# Altium PCB MiniPC.PcbDoc (part 8 of 24)
Units mm, origin at the board's own origin, x right, y up, seen from the top; angles counter-clockwise.
Board outline 175 x 155 mm, 16 copper layers (1_Top, 2_int1_(gnd), 3_int2_(power), 4_int3_(gnd), 5_int4_(sign), 6_int5_(power), 7_int6_(sign), 8_int7_(power), 9_int8_(gnd), 10_int9_(sign), 11_int10_(gnd), 12_int11_(sign), 13_int12_(gnd), 14_int13_(power), 15_int14_(gnd), 16_Bottom), stack 2.008 mm thick; 1046 components, 837 nets, 6010 pads, 4009 vias.
Unrouted connection lines stored in the file: 564.
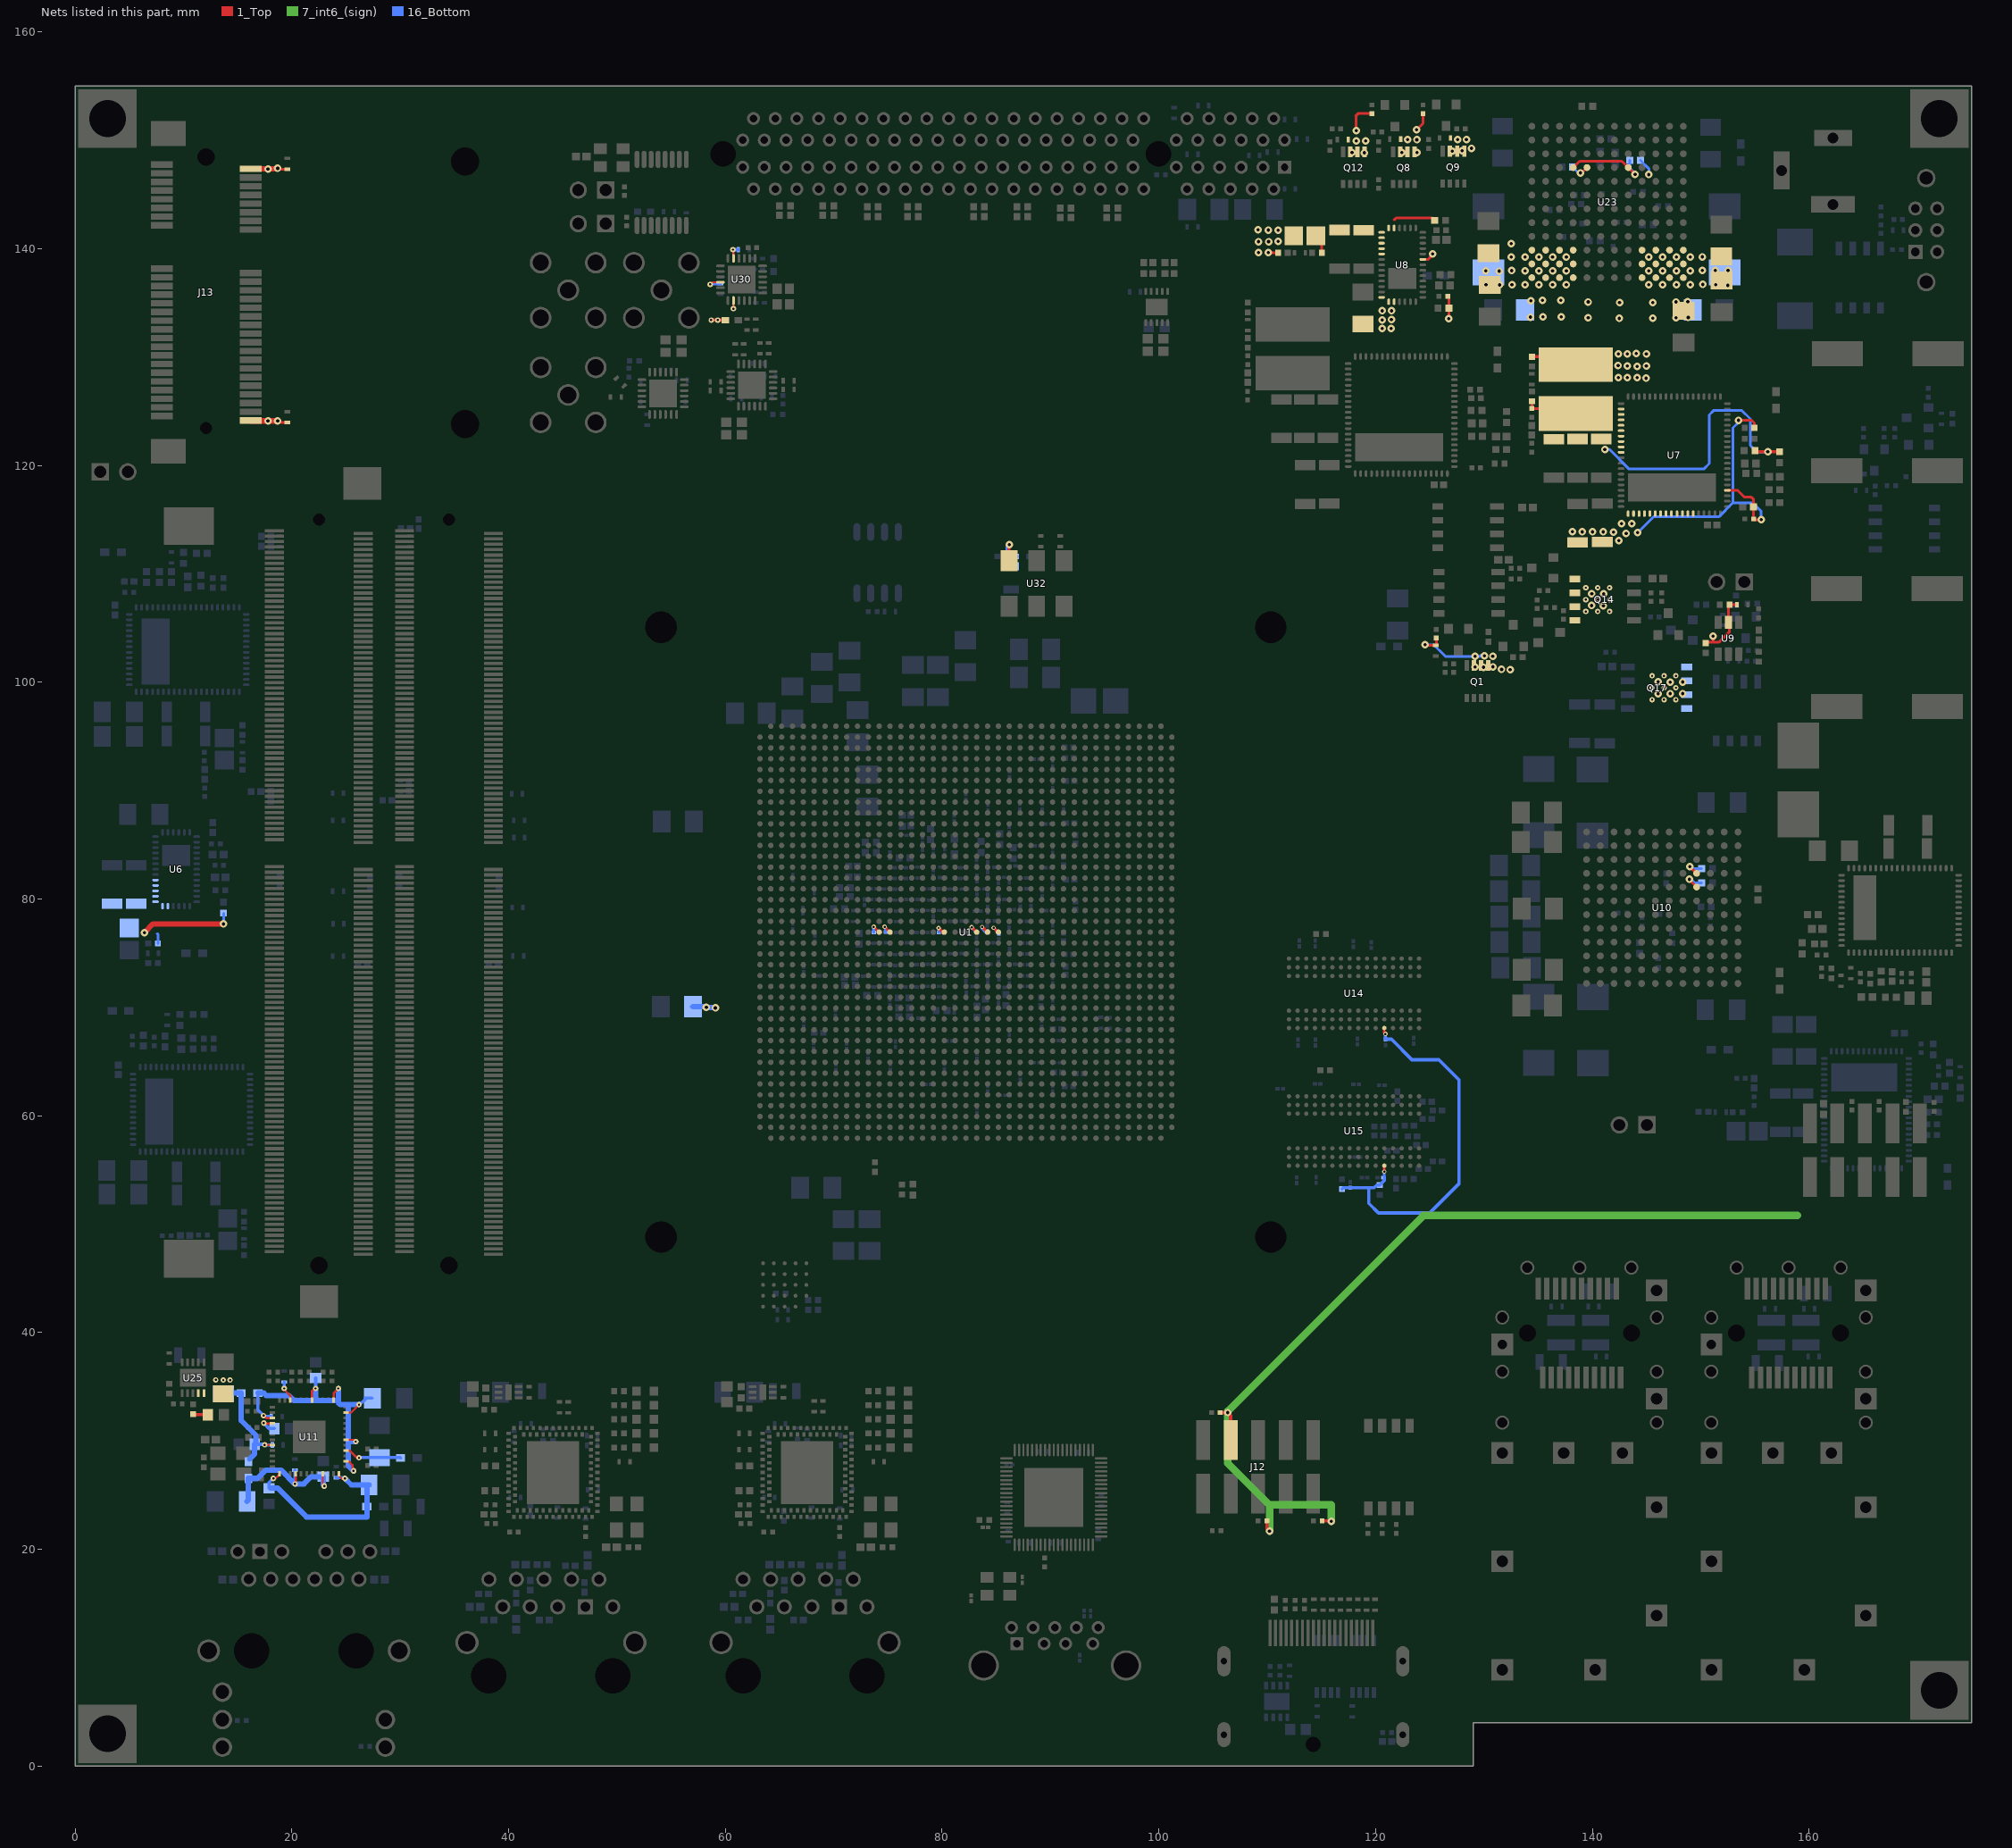
[diagram p20: the nets of this part, all layers, seen from the top]

## Part data (continued)
U3 U7: library part CMP-1689-00005-3, "PowerSoC Highly Integrated Synchronous Buck with Integrated Inductor, 2.5 to 6.6 V Input, -40 to 85 degC, 76-Pin QFN, RoHS, Tape and Reel", Max Operating Temperature="85 degC", Min Operating Temperature="-40 degC", Output Current="12 A", Package Quantity=250, ComponentLink1Description="Manufacturer URL", ComponentLink1URL=https://www.altera.com/, ComponentLink2Description=Datasheet, ComponentLink2URL=https://www.altera.com/content/dam/altera-www/global/en_US/pdfs/literature/ds/en63a0qi_07077.pdf, ComponentLink3Description="Package Specification", ComponentLink3URL=http://wl.altera.com/literature/ds/EN63A0QA_10398.pdf, DatasheetVersion="Rev. H", Height="0.12 inch", Length="0.43 inch", Mount="Surface Mount", Mounting Technology="Surface Mount", PackageDescription="76-Pin Quad-Flat No-Leads Package, Body 11 x 10 mm, Pitch 0.5 mm, Thermal Pad 2.6x8.1mm", PackageVersion="Rev. A, 10/2014", Packaging="Tape and Reel", PartNumber=EN63A0QI, Pins=76, Radiation Hardening=No, RoHSCompliant=True, Width="0.39 inch"
U6 U8: library part CMP-1689-00002-3, "PowerSoC Voltage Mode Synchronous PWM Buck with Integrated Inductor, 2.5 to 6.6 V Input, -40 to 85 degC, 38-Pin QFN, RoHS, Tape and Reel", Max Operating Temperature="85 degC", Min Operating Temperature="-40 degC", Output Current="3 A", Package Quantity=500, ComponentLink1Description="Manufacturer URL", ComponentLink1URL=https://www.altera.com/, ComponentLink2Description=Datasheet, ComponentLink2URL=https://www.altera.com/content/dam/altera-www/global/en_US/pdfs/literature/ds/en6337qi_05800.pdf, DatasheetVersion="Rev. E", Height="0.07 inch", Length="0.28 inch", Mount="Surface Mount", Mounting Technology="Surface Mount", PackageDescription="38-Pin Quad Flat No-Leads Package, Body 7 x 4 mm, Pitch 0.5 mm, Thermal Pad 2.6 x 1.94 mm", Packaging="Tape and Reel", PartNumber=EN6337QI, Pins=38, Radiation Hardening=No, RoHSCompliant=True, Width="0.16 inch"
U9: library part CMP-1708-00001-4, "Window Comparator with Internal Reference for Overvoltage and Undervoltage Detection, 1.8 to 18 V, -40 to 125 degC, 6-Pin SOT (DDC), Green (RoHS & no Sb/Br), Tape and Reel", Case/Package=SOT-6, Max Operating Temperature="125 degC", Max Supply Voltage="18 V", Min Operating Temperature="-40 degC", Min Supply Voltage="1.8 V", Package Quantity=3000, Code_JEDEC=MO-193, ComponentLink1Description="Manufacturer URL", ComponentLink1URL=http://www.ti.com/, ComponentLink2Description=Datasheet, ComponentLink2URL=http://www.ti.com/lit/ds/symlink/tps3700.pdf, ComponentLink3Description="Package Specification", ComponentLink3URL=http://www.ti.com/litv/pdf/mpds124d, DatasheetVersion=SBVS187D, Mount="Surface Mount", Mounting Technology="Surface Mount", PackageDescription="6-Pin Small Outline Transistor, Body 2.9 x 1.6 mm, Pitch 0.95 mm", PackageVersion="4204403-3/E, 06/2005", Packaging="Tape and Reel", PartNumber=TPS3700DDCR, Pins=6, RoHSCompliant=True
U10: library part CMP-1701-00001-1, "Dual 18 A or Single 36 A uModule Regulator with Digital Power System Management, 4.5 to 16 V Input, 0.5 to 1.8 V Output, -40 to 125 degC, 144-Ball BGA, RoHS, Tray", Manufacturer="Linear Technology", ComponentLink1Description="Manufacturer URL", ComponentLink1URL=http://www.linear.com/, ComponentLink2Description=Datasheet, ComponentLink2URL=http://cds.linear.com/docs/en/datasheet/4677f.pdf, ComponentLink3Description="Package Specification", ComponentLink3URL=http://www.linear.com/docs/41077, DatasheetVersion="Rev. F", Mounting Technology="Surface Mount", PackageDescription="144-Ball Ball Grid Array, Body 16 x 16 mm, Pitch 1.27 mm", PackageReference=BGA-144, PackageVersion="Rev. B, 02/2013", PartId=1, PartNumber=LTM4677IY#PBF
U11: library part CMP-1337-00004-2, "Gigabit Ethernet Transceiver with RGMII Support, 1.14 to 1.26 V, 0 to 70 degC, 48-Pin QFN, RoHS", Manufacturer=Micrel, Temperature Range="0 to 70 degC", ComponentLink1Description="Manufacturer URL", ComponentLink1URL=http://www.micrel.com/, ComponentLink2Description=Datasheet, ComponentLink2URL=http://www.micrel.com/_PDF/Ethernet/datasheets/KSZ9031RNX.pdf, ComponentLink3Description="Package Specification", ComponentLink3URL=http://www.micrel.com/_PDF/Ethernet/datasheets/KSZ9031RNX.pdf, DatasheetVersion="Rev. 2.1", Drivers=4, DVDDL="1.14 to 1.26 V", ILED="8 mA Typ.", Mounting Technology="Surface Mount", Output Tri-State Leakage="10 uA Max.", PackageDescription="48-Pin Quad Flat Non-Lead Package, Body 7 x 7 mm, Pitch 0.5 mm", PartNumber=KSZ9031RNXCA, Receivers=4, RoHS=TRUE, VSET@R(ISET)="12.1 KOhm=1.2 V Typ."
U12: library part CMP-1689-00003-3, "PowerSoC Voltage Mode Synchronous PWM Buck with Integrated Inductor, 4 A, 4.5 to 14 V Input, 0.75 to 5 V Output, -40 to 85 degC, 68-Pin QFN, RoHS, Tape and Reel", Max Operating Temperature="85 degC", Min Operating Temperature="-40 degC", Package Quantity=1, ComponentLink1Description="Manufacturer URL", ComponentLink1URL=https://www.altera.com/, ComponentLink2Description=Datasheet, ComponentLink2URL=https://www.altera.com/content/dam/altera-www/global/en_US/pdfs/literature/ds/en2342qi_09520.pdf, DatasheetVersion="Rev. F", Mount="Surface Mount", Mounting Technology="Surface Mount", PackageDescription="68-Pin Quad Flat No-lead Package, Body 11 x 8 mm, Pitch 0.5 mm, Thermal Pad 2.1 x 6 mm", Packaging="Cut Tape", PartNumber=EN2342QI, Pins=68, RoHSCompliant=True
U13: library part CMP-1701-00004-2, "Nanopower Precision Shunt Voltage Reference, 1.25 V, 0.05%, 10 ppm/degC, 0 to 70 degC, 8-Pin S8, Tube", Current - Cathode=600µA, Current - Output=20mA, Current - Supply=-, Operating Temperature="0°C ~ 70°C (TA)", Package / Case="8-SOIC (0.154&quot;, 3.90mm Width)", Standard Package=100, Temperature Coefficient=10ppm/°C, Tolerance=±0.05%, Voltage - Output (Min/Fixed)=1.25V, Category="Integrated Circuits (ICs)", ComponentLink1Description="Manufacturer URL", ComponentLink1URL=http://www.linear.com/, ComponentLink2Description=Datasheet, ComponentLink2URL=http://cds.linear.com/docs/en/datasheet/1389fa.pdf, DatasheetVersion="Rev. A", Family="PMIC - Voltage Reference", Mounting Technology="Surface Mount", Mounting Type="Surface Mount", Noise - 0.1Hz to 10Hz=25µVp-p, Noise - 10Hz to 10kHz=-, Output Type=Fixed, PackageDescription="8-Pin Small Outline Integrated Package, Body 5 x 4 mm, Pitch 1.27 mm", Packaging=Tube, PartNumber=LT1389ACS8-1.25, Product Training Modules="Voltage Reference Basics", Reference Type=Shunt, Series=-, Voltage - Input=-, Voltage - Output (Max)=-
U14 U15: library part CMP-1718-00002-1, "8 Gb DDR4 SDRAM, 512 Meg x 16, 1.2 V, 0 to 95 degC, 96-Ball FBGA (LY), RoHS", ComponentLink1Description="Manufacturer URL", ComponentLink1URL=http://www.micron.com/, ComponentLink2Description=Datasheet, ComponentLink2URL=https://www.micron.com/~/media/documents/products/data-sheet/dram/ddr4/8gb_ddr4_sdram.pdf, DatasheetVersion="Rev. E, 05/2016", Mounting Technology="Surface Mount", PackageDescription="96-Ball Fine Pitch Ball Grid Array, Body 7.5 x 13.5 mm, Pitch 0.8 mm", PartId=1, PartNumber=MT40A512M16LY-107E
U16: library part CMP-0247-00012-3, "Adjustable Current-Limit Switch, 1.7 to 5.5 V, -40 to 125 degC, 8-Pin TDFN (T833+2), RoHS", Manufacturer=Maxim, Operating Temperature="-40 to 125 degC", ComponentLink1Description="Manufacturer URL", ComponentLink1URL=http://www.maximintegrated.com/, ComponentLink2Description=Datasheet, ComponentLink2URL=http://datasheets.maximintegrated.com/en/ds/MAX14523A-MAX14523C.pdf, ComponentLink3Description="Package Specification", ComponentLink3URL=http://pdfserv.maximintegrated.com/package_dwgs/21-0137.PDF, DatasheetVersion="Rev. 1", ILIM="0.25 to 1.5 A", IQ="170 uA Typ.", Mounting Technology="Surface Mount", PackageDescription="8-Pin SON, Body 3 x 3 mm, Pitch 0.65 mm", PackageVersion=Mar-14, PartNumber=MAX14523AATA+, RoHS=TRUE, RON="70 mOhm Typ.", VIH="1.6 V Min.", VIL="0.4 V Max.", VIN="1.7 to 5.5 V"
U17 U20: library part CMP-1702-00002-3, "Integrated 10/100/1000 Ultra Gigabit Ethernet Transceiver, Commercial Grade, 96-Pin QFN, RoHS", ComponentLink1Description="Manufacturer URL", ComponentLink1URL=http://www.marvell.com/, ComponentLink2Description=Datasheet, ComponentLink2URL=http://www.marvell.com//transceivers/assets/Marvell-Alaska-Ultra-88E1111-GbE.pdf, DatasheetVersion="Rev. A", Mounting Technology="Surface Mount", PackageDescription="96-Pin Quad Flat No-lead Package, Body 9 x 9 mm, Pitch 0.3 mm", PartNumber=88E1111-B2-NDC2C000
U18 U21 U24: library part CMP-1695-00002-3, "Crystal Oscillator (SPXO), 2.5 V, 25 MHz, -20 to 70 degC, 4-Pin SMD, RoHS, Tape and Reel", Max Operating Temperature="70 degC", Min Operating Temperature="-20 degC", ComponentLink1Description="Manufacturer URL", ComponentLink1URL=https://www.eea.epson.com/, ComponentLink2Description=Datasheet, ComponentLink2URL=http://www5.epsondevice.com/en/products/spxo_standard/sg310sdf.html#, DatasheetVersion="Rev. Feb-15", Height="1.05 mm", Length="3.2 mm", Mounting Technology="Surface Mount", PackageDescription="4-Pin Surface Mount Device, Body 3.2 x 2.5 mm", Packaging="Tape and Reel", PartNumber="SG-310SDF 25.0000M-B3", RoHSCompliant=True, Width="2.5 mm"
U19 U22: library part CMP-0476-00124-4, "500 mA Micropower VLDO Linear Regulator, 0.9 to 5.5 V Vin, Adjustable Vout, 6-pin SON (DC6-6), -40 to 125 degC, Pb-Free", Dropout Voltage(V)=0.085, Manufacturer="Linear Technology", Output Voltage=Adj, Shutdown Current(uA)=1, Code_JEDEC=MO-229, ComponentLink1Description="Manufacturer URL", ComponentLink1URL=http://www.linear.com/, ComponentLink2Description=Datasheet, ComponentLink2URL=http://cds.linear.com/docs/en/datasheet/30251234ff.pdf, ComponentLink3Description="Package Specification", ComponentLink3URL=http://cds.linear.com/docs/en/packaging/DFN_6_05-08-1703.pdf, DatasheetVersion="Rev. F", Discrete Pass Element=no, Iout(mA)=500, Isupply(mA)=0.05, Mounting Technology="Surface Mount", Noise(uV)=80, Number of Outputs=1, PackageDescription="6-Pin Plastic DFN, Body 2 x 2 mm, Pitch 0.5 mm", PackageReference=DC6-6, PackageVersion="Rev. B, 06/2010", PartNumber=LTC3025EDC-1#PBF, RoHS=TRUE, Vin Max(V)=5.5, Vin Min(V)=0.9, Vout Max(V)=3.6, Vout Min(V)=0.4
U23: library part CMP-1701-00002-3, "Dual 13 A or Single 26 A uModule Regulator with Digital Power System Management, 4.5 to 26.5 V Input, 0.5 to 5.4 V Output, -40 to 125 degC, 144-Ball BGA, RoHS, Tray", Case/Package=BGA, Max Operating Temperature="125 degC", Min Operating Temperature="-40 degC", Output Current="26 A", Package Quantity=90, ComponentLink1Description="Manufacturer URL", ComponentLink1URL=http://www.linear.com/, ComponentLink2Description=Datasheet, ComponentLink2URL=http://cds.linear.com/docs/en/datasheet/4676fd.pdf, ComponentLink3Description="Package Specification", ComponentLink3URL=http://www.linear.com/docs/41077, DatasheetVersion="Rev. D", Height="0.2 inch", Length="0.63 inch", Mount="Surface Mount", Mounting Technology="Surface Mount", PackageDescription="144-Ball Ball Grid Array, Body 16 x 16 mm, Pitch 1.27 mm", PackageVersion="Rev. B, 02/2013", Packaging=Rail/Tube, PartId=1, PartNumber=LTM4676IY#PBF, Pins=144, REACH SVHC="No SVHC", RoHSCompliant=True, Width="0.63 inch"
U25: library part CMP-0476-00185-2, "1.5 A Low Input Voltage VLDO Linear Regulator, Boost Converter Disabled, Require 5 V External Supply, 1.14 to 5.5 V Vin, Adjustable Vout, 10-pin SON (DD-10), -40 to 125 degC, Pb-Free", Dropout Voltage(V)=0.1, Manufacturer="Linear Technology", Output Voltage=Adj, Shutdown Current(uA)=0.6, Code_JEDEC=MO-229, ComponentLink1Description="Manufacturer URL", ComponentLink1URL=http://www.linear.com/, ComponentLink2Description=Datasheet, ComponentLink2URL=http://cds.linear.com/docs/en/datasheet/30261f.pdf, ComponentLink3Description="Package Specification", ComponentLink3URL=http://cds.linear.com/docs/en/packaging/DFN_10_05-08-1699.pdf, Discrete Pass Element=no, Iout(mA)=1500, Isupply(mA)=0.095, Mounting Technology="Surface Mount", Noise(uV)=110, Number of Outputs=1, PackageDescription="10-Pin Plastic DFN, Body 3 x 3 mm, Pitch 0.5 mm", PackageReference=DD-10, PackageVersion="Rev. C, 06/2010", PartNumber=LTC3026EDD-1#PBF, PSRR(dB)=42, RoHS=TRUE, Vin Max(V)=5.5, Vin Min(V)=1.14, Vout Max(V)=2.6, Vout Min(V)=0.4
U26: library part CMP-1689-00001-1, "EPCQ-L Serial Configuration Device, 1.8 V, -40 to 85 degC, 24-Pin FBGA, RoHS, Tray", Manufacturer=Altera, ComponentLink1Description="Manufacturer URL", ComponentLink1URL=https://www.altera.com/, ComponentLink2Description=Datasheet, ComponentLink2URL=https://www.altera.com/content/dam/altera-www/global/en_US/pdfs/literature/hb/cfg/cfg_cf52013.pdf, ComponentLink3Description="Package Specification", ComponentLink3URL=https://www.altera.com/content/dam/altera-www/global/en_US/pdfs/literature/packaging/04r00469-01.pdf, DatasheetVersion="Rev. 2016-05-30", Mounting Technology="Surface Mount", PackageDescription="24-Pin FineLine Ball-Grid Array, Body 6 x 8 mm, Pitch 1 mm", PackageReference=FBGA24_A-130, PackageVersion="Rev. 2.0, 01/2015", PartId=1, PartNumber=EPCQL1024F24IN
U27 U28: library part CMP-1706-00002-1, "I2C-Programmable Any-Frequency, Any-Output Quad Clock Generator, 1.8 / 2.5 / 3.3 V, 0.16 to 350 MHz Output, -40 to 85 degC, 24-Pin QFN, RoHS", Manufacturer="Silicon Labs", Code_IPC=J-STD-020, ComponentLink1Description="Manufacturer URL", ComponentLink1URL=http://www.silabs.com/, ComponentLink2Description=Datasheet, ComponentLink2URL=https://www.silabs.com/Support%20Documents/TechnicalDocs/Si5338.pdf, DatasheetVersion="Rev. 1.6", Mounting Technology="Surface Mount", PackageDescription="24-Pin Quad Flat No-lead Package, Body 4 x 4 mm, Pitch 0.5 mm", PackageReference=QFN-24, PartId=1, PartNumber=Si5338B-B03799-GM
U29: library part CMP-1706-00007-1, "PCI-Express Gen 1 Dual Output Clock Generator, 3.13 to 3.46 V, -40 to 85 degC, 10-Pin TDFN, RoHS, Tube", Manufacturer="Silicon Labs", Code_IPC=J-STD-020, Code_JEDEC=MO-229, ComponentLink1Description="Manufacturer URL", ComponentLink1URL=http://www.silabs.com/, ComponentLink2Description=Datasheet, ComponentLink2URL=http://www.silabs.com/Support%20Documents/TechnicalDocs/Si52112-A1-A2.pdf, DatasheetVersion="Rev. 1.2", Mounting Technology="Surface Mount", PackageDescription="10-Pin Small Outline Non-Lead, Body 3.00 x 3.00 mm, Pitch 0.50 mm", PackageReference=TDFN-10, PartNumber=Si52112-A1-GM2
U30: library part CMP-1706-00005-1, "I2C-Programmable Any-Frequency, Any-Output Quad Clock Generator, 1.8 / 2.5 / 3.3 V, 0.16 to 200 MHz Output, -40 to 85 degC, 24-Pin QFN, RoHS", Manufacturer="Silicon Labs", Code_IPC=J-STD-020, ComponentLink1Description="Manufacturer URL", ComponentLink1URL=http://www.silabs.com/, ComponentLink2Description=Datasheet, ComponentLink2URL=https://www.silabs.com/Support%20Documents/TechnicalDocs/Si5338.pdf, DatasheetVersion="Rev. 1.6", Mounting Technology="Surface Mount", PackageDescription="24-Pin Quad Flat No-lead Package, Body 4 x 4 mm, Pitch 0.5 mm", PackageReference=QFN-24, PartId=1, PartNumber=Si5338C-B03798-GM
U31: library part CMP-1699-00001-1, "Single-Ended Multiplexer, 2.375 to 3.465 V, -40 to 85 degC, 16-Pin TSSOP, RoHS, Tube", Manufacturer=IDT, ComponentLink1Description="Manufacturer URL", ComponentLink1URL=http://www.idt.com/, ComponentLink2Description=Datasheet, ComponentLink2URL=https://datasheet.ciiva.com/6676/idt-83054i-dst-20091106-6676576.pdf, DatasheetVersion="Rev. C", Mounting Technology="Surface Mount", PackageDescription="16-Pin Thin Shrink Small Outline Package, Body 5 x 4.4 mm, Pitch 0.65 mm", PackageReference=TSSOP-16, PartNumber=ICS83054AGILF
U32: library part CMP-1706-00001-1, "Dual Frequency Voltage-Controlled Crystal Oscillator (VCXO), LVDS, 2.5 V, 100 KHz to 250 MHz, -40 to 85 degC, 6-Pin DFN, RoHS, Tray", Manufacturer="Silicon Labs", ComponentLink1Description="Manufacturer URL", ComponentLink1URL=http://www.silabs.com/, ComponentLink2Description=Datasheet, ComponentLink2URL=http://www.silabs.com/Support%20Documents/TechnicalDocs/Si516.pdf, DatasheetVersion="Rev. 1.0", Mounting Technology="Surface Mount", PackageDescription="6-Pin Small Outline No-lead, Body 5 x 7 mm, Pitch 2.54 mm", PackageReference=DFN-6, PartNumber=516FHA000132AAG
U33: library part CMP-1723-00001-1, "32 Bit USB 3.0 to FIFO Bridge, 5 Gbps, 3 to 3.6 V, -40 to 85 degC, 76-Pin QFN, Pb-Free", ComponentLink1Description="Manufacturer URL", ComponentLink1URL=http://www.ftdichip.com/, ComponentLink2Description=Datasheet, ComponentLink2URL=http://www.ftdichip.com/Support/Documents/DataSheets/ICs/DS_FT600Q-FT601Q%20IC%20Datasheet.pdf, DatasheetVersion="Rev. 1.02, 02/2016", Mounting Technology="Surface Mount", PackageDescription="76-Pin Quad Flat No-lead Package, Body 9 x 9 mm, Pitch 0.4 mm, Thermal Pad 5.45 x 5.45 mm", PackageReference=QFN-76, PartId=1, RoHSCompliant=false
X1 Y5: library part CMP-1688-00001-1, "CMOS Compatible SMD Crystal Oscillator, 33 MHz, 2.5 V, -20 to 70 degC, 4-Pin SMD, RoHS, Tape and Reel", Manufacturer=Abracon, ComponentLink1Description="Manufacturer URL", ComponentLink1URL=http://www.abracon.com/, ComponentLink2Description=Datasheet, ComponentLink2URL=http://www.abracon.com/Oscillators/ASE2series.pdf, DatasheetVersion="Rev. Aug-14", Mounting Technology="Surface Mount", PackageDescription="4-Pin Surface Mount Device, Body 3.2 x 2.5 mm, Pitch 2.1 mm", PackageReference=ASE2, PartNumber=ASE2-33.000MHZ-ET
Y1 Y2 Y3 Y4: library part CMP-1695-00001-3, "Range Crystal Unit, 25 MHz, -40 to 85 degC, 4-Pin SMD, RoHS, Tape and Reel", ComponentLink1Description="Manufacturer URL", ComponentLink1URL=https://www.eea.epson.com/, ComponentLink2Description=Datasheet, ComponentLink2URL=https://support.epson.biz/td/api/doc_check.php?dl=brief_FA-128_en.pdf, DatasheetVersion="Rev. Feb-15", Mounting Technology="Surface Mount", PackageDescription="4-Pin Surface Mount Device, Body 1.6 x 2 mm, Pitch 1.45 mm", PartNumber="FA-128 25.0000MB-C"

## Free pads (board coordinates)
  round 0 hole 2.9: 0(54.069,48.814) 1(110.319,48.814) 2(54.069,105.064) 3(110.319,105.064)
  round 0 hole 2.6: 4(36,148.025) 5(36,123.825)

## Via types
v1: diameter 0.4, hole 0.2, 1_Top to 16_Bottom, tented both sides, 1658 vias
v2: diameter 0.5, hole 0.2, 1_Top to 16_Bottom, tented both sides, 1014 vias
v3: diameter 0.7, hole 0.3, 1_Top to 16_Bottom, tented both sides, 915 vias
v4: diameter 0.6, hole 0.2, 1_Top to 16_Bottom, tented both sides, 278 vias
v5: diameter 0.4, hole 0.2, 1_Top to 16_Bottom, 93 vias
v6: diameter 0.4/0/0/0/0/0/0/0/0/0/0/0/0/0/0/0.4 (per signal layer), hole 0.2, 1_Top to 16_Bottom, tented both sides, 18 vias
v7: diameter 0.4/0/0/0/0/0/0/0/0/0/0/0.4/0.4/0.4/0.4/0.4 (per signal layer), hole 0.2, 1_Top to 16_Bottom, tented both sides, 16 vias
v8: diameter 0.5, hole 0.254, 1_Top to 16_Bottom, tented both sides, 15 vias
v9: diameter 0.5, hole 0.2, 1_Top to 16_Bottom, 2 vias

## Nets (pads, with @x,y where several pads share a name; then routed paths per layer and width w, separated by ;. In a path a pad name is that pad's centre, name@x,y a point inside that pad or via, vN(x,y) a via of type N, cw(c..) or ccw(c..) an arc to the next point about the centre after c; other vN are vias at no path point)
0.9VO_SENSE+: R142.1 U10.D9 | length 2.1
  1_Top w0.254: v3(148.99,82.995) U10.D9@149.615,82.37
  16_Bottom w0.254: v3(148.99,82.995) 149.19,82.795 R142.1@150.09,82.795
0.9VO_SENSE-: R143.1 U10.E9 | length 2.3
  1_Top w0.25: v3(148.96,81.815) 148.96,81.755 149.455,81.26 U10.E9@149.455,81.1
  16_Bottom w0.25: v3@148.96,81.715 v3(148.96,81.815)
  16_Bottom w0.254: v3@148.99,81.895 149.39,81.495 R143.1@150.09,81.495
0V95: C46.2 C47.2 C161.2 C162.2 C163.2 C164.2 C165.2 C166.2 C167.2 R83.2 R84.2 R85.1 U1.Y12 U1.Y13 U1.Y18 U1.Y21 U1.Y22 U1.Y23 U6.5 U6.6 U6.7 U6.8 U6.9 U6.10 U6.11 | length 19.5
  1_Top w0.25: v1(73.694,77.439) U1.Y12@74.194,76.939 ; v1(74.694,77.439) U1.Y13@75.194,76.939
  1_Top w0.3: v1(79.675,77.325) 80.061,76.939 U1.Y18@80.194,76.939 ; v1(82.725,77.4) 82.733,77.4 U1.Y21@83.194,76.939 ; v1(83.685,77.425) 83.708,77.425 U1.Y22@84.194,76.939 ; v1(84.75,77.35) 85.161,76.939 U1.Y23@85.194,76.939
  1_Top w0.5: v3(6.4,76.9) 7.2,77.7 v3(13.7,77.7)
  16_Bottom w0.25: 7.6,76.8 7.65,76.75 R84.2@7.65,75.9 ; v3(13.7,77.7) R85.1@13.7,78.7
  16_Bottom w0.3: C161.2@56.875,70.075 C161.2@57,70.075 ; v3@58.975,70 59,70.025 v3(59.075,69.95) ; C164.2@73.685,76.925 73.685,77.431 v1(73.694,77.439) ; v1(74.694,77.439) 74.785,77.348 C167.2@74.785,76.95 ; v1(79.675,77.325) 79.69,77.31 C163.2@79.69,76.925 ; v1(82.725,77.4) 82.725,77.385 C166.2@83.175,76.935 ; v1(83.685,77.425) 83.685,77.301 83.996,76.99 C162.2@84.175,76.99 ; v1(84.75,77.35) 85.225,76.875 C165.2@85.225,76.835
  16_Bottom w0.5: C161.2@57,70.075 58.175,70.075 v3(58.25,70) v3@58.975,70
1.2V_AVDDL: C371.2 C372.2 C373.2 L11.2 U11.4 U11.9 | length 14.7
  1_Top w0.2: v2(20.3,26.05) 20.362,25.988 U11.4@20.362,26.975 ; U11.9@22.862,26.975 22.862,25.988 v2(23,25.85)
  16_Bottom w0.3: v2@20.297,26.025 C373.2@20.297,27.325
  16_Bottom w0.5: C371.2@15.872,24.425 15.997,24.55 L11.2@15.997,26.55 16.822,26.55 17.597,27.325 18.997,27.325 20.297,26.025 20.321,26.05 21.121,26.05 21.772,26.7 C372.2@22.897,26.7 22.897,25.953 v2(23,25.85)
1.2V_AVDLL_PLL: C367.2 C368.2 C369.2 C374.2 C375.2 L11.1 L13.1 R314.2 U11.44 U25.9 U25.10 | length 12.1
  1_Top w0.2: v2(13.677,35.625) v2@13.687,35.635 ; v2(17.5,29.65) 17.5,29.55 17.576,29.625 U11.44@18.212,29.625
  1_Top w0.3: R314.2@10.897,32.425 C375.2@12.272,32.425
  16_Bottom w0.3: C367.2@13.597,34.425 C367.2@13.722,34.3 ; C368.2@16.562,29.7 16.697,29.7 17.422,29.7 17.472,29.65 v2(17.5,29.65) C369.2@18.2,29.65
  16_Bottom w0.5: C367.2@14.197,34.425 L13.1@15.322,34.425 15.322,31.9 16.697,30.525 C368.2@16.697,29.7 ; L11.1@16.097,28.325 16.562,28.79 C368.2@16.562,29.7
  other v2: 14.297,35.625 12.979,35.636
1.2V_DVDDL: C381.2 C382.2 C383.2 L13.2 U11.14 U11.18 U11.23 U11.26 U11.30 U11.39 | length 31.9
  1_Top w0.17: U11.18@25.012,30.125 25.724,30.125 v2(25.9,29.95)
  1_Top w0.2: v2(17.4,32.35) 17.423,32.35 17.647,32.125 U11.39@18.212,32.125 ; U11.30@21.862,33.775 21.862,34.611 22.1,34.85 v2(22.2,34.85) ; U11.26@23.862,33.775 23.862,34.404 24.3,34.843 v2(24.3,34.85) ; U11.14@25.012,28.125 25.245,28.125 25.6,27.77 25.6,27.35 v2(25.7,27.25) ; U11.23@25.012,32.625 25.476,32.625 v2(26.2,33.35)
  16_Bottom w0.3: L13.2@16.872,34.425 16.872,32.878 v2(17.4,32.35) 17.5,32.25 C383.2@18.1,32.25 ; v2@22.2,34.829 v2(22.2,34.85) C382.2@22.2,35.825 ; v2@26.197,33.425 26.271,33.5 26.428,33.5 26.75,33.822 26.75,33.95 C381.2@27.425,33.95
  16_Bottom w0.5: L13.2@16.872,34.425 17.405,34.425 17.631,34.2 19.722,34.2 20.197,33.725 22.197,33.725 ; v2@22.2,34.829 22.197,34.825 22.197,33.725 ; v2(24.3,34.85) 24.297,34.846 24.297,33.625 ; v2(25.7,27.25) 25.197,27.753 25.197,29.947 ; v2(25.9,29.95) 25.897,29.947 25.197,29.947 ; v2(26.2,33.35) 25.197,33.35 ; 22.197,33.725 24.197,33.725 24.297,33.625 ; 24.297,33.625 24.297,33.525 24.472,33.35 25.197,33.35 ; 25.197,29.947 25.197,33.35
1.8V_DVDDH: C385.2 C386.2 C387.1 L14.2 U11.16 U11.34 U11.40 | length 9.2
  1_Top w0.2: v2(17.408,31.658) 17.496,31.658 17.528,31.625 U11.40@18.212,31.625 ; v2(19.3,34.85) 19.3,34.75 19.862,34.188 U11.34@19.862,33.775 ; U11.16@25.012,29.125 25.324,29.125 26,28.45 v2(26.2,28.45)
  16_Bottom w0.3: v2(17.408,31.658) 17.916,31.15 C386.2@18.375,31.15 ; v2@19.297,34.825 19.3,34.829 v2(19.3,34.85) C387.1@19.3,35.45 ; v2(26.2,28.45) 26.225,28.475 C385.2@28.1,28.475 30,28.475 L14.2@30.025,28.45
1V8: Q17.5 Q17.6 Q17.7 Q17.8 R96.1 R98.2 | length 4.3
  1_Top w0.3: R98.2@134.43,130.02 137.73,130.02 R96.1@138.47,129.28
  other v2: 145.505,98.385 146.605,98.385 147.705,98.385 145.505,99.485 146.605,99.485 147.705,99.485 145.505,100.585 146.605,100.585 147.705,100.585
  other v3: 146.06,98.92 147.17,98.95 148.32,98.95 147.16,100.01 148.33,100.02 146.07,100.03 144.96,128.04 142.39,128.11 143.23,128.1 144.13,128.1 144.13,129.13 143.22,129.16 142.37,129.2 144.97,129.18 142.38,130.28 143.22,130.29 144.97,130.28 144.05,130.31
1V8_OUT: C54.2 C55.2 C56.2 R92.1 R95.1 R96.2 R97.2 R99.2 U7.20 U7.21 U7.22 U7.23 U7.24 U7.25 U7.26 U7.27 U7.28 | length 30.9
  1_Top w0.25: R99.2@134.42,125.92 134.42,125.26 R92.1@134.41,125.25 138,125.25 R96.2@138.47,124.78 ; R97.2@155,121.35 155.091,121.26 v3(156.18,121.26) R95.1@157.27,121.26
  16_Bottom w0.25: v3(141.14,121.48) 141.56,121.48 143.38,119.66 150.27,119.66 150.77,120.16 150.77,124.66 151.17,125.06 153.79,125.06 154.57,124.28 154.57,121.84 155.15,121.26 v3(156.18,121.26)
1V8_PLL: C537.2 C538.2 L20.1 U30.11 U30.16 U30.20 | length 5.4
  1_Top w0.17: v2(58.6,136.699) 58.801,136.9 U30.16@59.545,136.9 ; v2(60.7,139.9) 60.745,139.855 U30.11@60.745,139.1 ; v2(60.745,134.455) U30.20@60.745,135.2
  1_Top w0.3: v2(58.7,133.4) v2(59.3,133.4) L20.1@60,133.4
  16_Bottom w0.3: v2(58.6,136.699) 58.676,136.775 C538.2@59.545,136.775 ; v2@60.7,134.5 v2(60.745,134.455) ; v2(60.7,139.9) C537.2@61.175,139.9
2.5V_SI516: C548.2 C549.2 L22.1 U32.6 | length 4.8
  1_Top w0.3: U32.6@86.17,111.2 86.17,112.67 v3(86.2,112.7)
  16_Bottom w0.3: v3(86.2,112.7) 86,112.7 85.989,112.689 L22.1@85.989,111.6 ; C549.2@86.36,110.7 85.989,111.07 L22.1@85.989,111.6 ; C548.2@86.91,111.6 L22.1@85.989,111.6
2V5: C1.2 Q1.1 Q1.2 Q1.3 R1.2 R104.2 R105.2 | length 8.4
  1_Top w0.25: v3(110.09,139.63) 110.11,139.61 R104.2@110.99,139.61 ; v3(124.56,103.45) 124.6,103.41 C1.2@125.55,103.41 125.59,103.45 R1.2@125.59,104.07
  16_Bottom w0.25: v3(124.56,103.45) 125.36,103.45 126.321,102.489 126.332,102.5 126.442,102.39 v3(129.17,102.39) 129.6,102.39 129.71,102.5 v3@129.81,102.4
  other v3: 132.41,101.15 131.62,101.18 129.96,101.38 129.17,101.4 130.81,101.42 130.8,102.4 130.03,102.42 109.2,139.62 109.2,140.64 110.12,140.64 111.01,140.67 111.01,141.68 109.16,141.72 110.09,141.71
2V5OUT: C62.2 C63.2 R105.1 R106.2 R107.1 U8.5 U8.6 U8.7 U8.8 U8.9 U8.10 U8.11 | length 5.7
  1_Top w0.25: R105.1@114.485,141.18 115.03,140.635 R106.2@115.03,139.61 ; 121.71,142.65 121.89,142.83 125.22,142.83 R107.1@125.45,142.6
3.3V_AVDDH: C378.2 C379.2 C380.2 L12.2 U11.1 U11.12 | length 19.2
  1_Top w0.2: v2(18.3,26.55) 18.5,26.55 18.862,26.911 U11.1@18.862,26.975 ; U11.12@24.362,26.975 24.362,26.788 24.6,26.55 v2(24.9,26.55)
  16_Bottom w0.3: C379.2@18.056,25.65 C379.2@17.897,25.65 17.897,26.177 18.269,26.55 v2(18.3,26.55) ; C380.2@24.097,26.625 24.824,26.625 v2(24.9,26.55)
  16_Bottom w0.5: C379.2@18.056,25.65 18.709,25.65 21.36,23 26.925,23 L12.2@26.925,23.95 26.925,25.75 C378.2@26.725,25.95 ; v2(24.9,26.55) 25.5,25.95 C378.2@26.725,25.95 ; C378.2@27.125,25.95 C378.2@26.725,25.95
3V3: C4.2 C5.2 C6.2 C52.2 C53.2 C61.2 C69.2 C95.1 C96.2 C97.2 C98.2 C101.1 C102.2 C103.2 C104.2 C105.2 C481.2 C482.1 J12.4 J13.2 J13.52 Q8.1 Q8.2 Q8.3 Q9.1 Q9.2 Q9.3 Q12.1 Q12.2 Q12.3 Q14.5 Q14.6 Q14.7 Q14.8 R12.2 R13.2 R100.1 R101.1 R102.2 R109.1 R111.1 R122.1 R123.1 R156.2 R329.2 R330.1 R331.1 U7.39 U7.40 U7.41 U7.42 U7.43 U7.44 U7.45 U7.46 U7.47 U7.48 U7.49 U7.50 U7.51 U7.60 U8.19 U8.20 U8.21 U8.33 U9.5 U23.A1 U23.A2 U23.A3 U23.B1 U23.B2 U23.B3 U23.C1 U23.C2 U23.C3 U23.D1 U23.D2 U23.D3 U23.J1 U23.J2 U23.J3 U23.K1 U23.K2 U23.K3 U23.L1 U23.L2 U23.L3 U23.M1 U23.M2 U23.M3 | length 137.2
  1_Top w0.25: v3(18.7,124.1) 18.84,123.96 C481.2@19.583,123.96 ; v3(18.7,147.4) 18.75,147.35 18.772,147.328 C482.1@19.583,147.328 ; v3(118.2,150.875) 118.2,152.22 118.17,152.25 118.37,152.45 R12.2@119.67,152.45 ; v3(123.77,150.95) 124.37,151.55 R13.2@124.37,152.45 ; U8.33@124.35,139 124.833,139 v3@125.05,139.217 ; v3(125.25,139.5) 125.25,139.425 v3@125.05,139.225 ; R111.1@126.55,135.7 126.75,135.5 R109.1@126.75,134.5 v3(126.75,133.54) ; R122.1@150.445,103.6 150.545,103.7 151.695,103.7 152.645,104.65 U9.5@152.645,105.55 ; U7.60@152.445,117.7 153.396,117.7 154.036,117.06 154.67,117.06 154.87,116.86 R100.1@154.87,116.16 R102.2@154.87,115.06 154.795,114.985 v3(155.57,114.985) ; U9.5@152.545,105.525 152.545,107.15 R123.1@152.645,107.15 C69.2@153.345,107.15 ; v3(153.47,124.16) 154.7,124.16 154.945,123.915 R101.1@154.945,123.46 ; v3@125.05,139.217 125.05,139.2 125.075,139.225 v3@125.05,139.225 ; v3@125.05,139.217 v3@125.05,139.225
  1_Top w0.3: R329.2@105.66,32.625 v3(106.36,32.625) 106.62,32.365 J12.4@106.62,30.1 ; R331.1@109.96,22.625 109.96,21.94 v3(110.2,21.7) ; R330.1@115.06,22.625 115.875,22.625 v3(115.9,22.6) ; 151.12,103.75 v3(151.12,104.25)
  1_Top w0.5: J13.52@16.2,124.15 16.25,124.1 v3(17.8,124.1) v3(18.7,124.1) ; J13.2@16.2,147.35 v3(17.8,147.35) v3@18.75,147.35
  7_int6_(sign) w0.7: v3(110.2,21.7) 110.2,24.1 ; v3(115.9,22.6) 115.9,24.1 110.2,24.1 ; 158.92,50.8 124.4,50.8 106.36,32.76 v3(106.36,32.625) 106.36,27.94 110.2,24.1
  16_Bottom w0.25: v3(144.18,113.8) 145.63,115.25 151.66,115.25 152.97,116.56 ; R156.2@144.438,148.138 145.2,147.375 v3(145.2,146.825) ; v3(153.47,124.16) 153.47,123.96 152.97,123.46 152.97,116.56 ; v3(155.57,114.985) 155.57,115.76 154.77,116.56 152.97,116.56
  other v2: 139.385,106.515 140.485,106.515 141.585,106.515 139.385,107.615 140.485,107.615 141.585,107.615 139.385,108.715 140.485,108.715 141.585,108.715
  other v3: 141.01,107.04 139.92,107.07 139.94,108.16 141.05,108.16 142.43,113.06 143.11,113.72 141.94,113.84 138.16,113.88 139.06,113.87 140,113.87 140.99,113.87 142.67,114.62 143.64,114.63 120.6,132.63 121.42,132.63 120.61,133.41 121.45,133.44 142.48,133.56 145.56,133.58 139.61,133.62 147.72,133.62 148.84,133.64 134.29,133.68 135.42,133.71 137.13,133.71 120.61,134.26 121.46,134.26 142.5,135.02 145.56,135.03 139.61,135.08 147.72,135.08 148.8,135.09 134.32,135.18 137.09,135.22 135.4,135.23 152.5,136.6 130.18,136.66 131.43,136.65 151.38,136.66 132.57,136.68 133.78,136.68 135.05,136.68 136.32,136.68 137.59,136.68 145.21,136.68 146.48,136.68 147.75,136.68 149.02,136.68 150.18,136.69 130.16,137.93 131.39,137.92 133.78,137.95 135.05,137.95 136.32,137.95 137.59,137.95 145.21,137.95 146.48,137.95 147.75,137.95 149.02,137.95 132.55,137.97 150.15,137.99 151.34,137.99 152.51,137.98 132.52,139.22 133.78,139.22 135.05,139.22 136.32,139.22 137.59,139.22 145.21,139.22 146.48,139.22 147.75,139.22 149.02,139.22 150.14,139.24 132.5,140.46 118.96,148.84 117.82,148.87 122.42,148.87 123.82,148.87 127.08,149 127.97,149.02 128.854,149.25 118.2,149.925 119.075,149.925 123.8,150.038 127.57,150.05 128.37,150.05 122.961,150.063
3V3_SENSE+: R156.1 U23.D9 U23.H9 | length 8
  1_Top w0.25: U23.D9@138.225,147.475 138.815,148.065 142.715,148.065 U23.H9@143.305,147.475 v3(143.938,146.843)
  16_Bottom w0.25: R156.1@143.438,148.138 143.438,147.438 143.938,146.938 v3(143.938,146.843)
3V3_SENSE-: R157.1 U23.E9 | length 2.1
  1_Top w0.25: v3(138.885,146.982) 138.885,146.865 139.335,147.315 U23.E9@139.495,147.315
  16_Bottom w0.25: R157.1@138.18,147.52 138.88,146.82 138.885,146.825 v3(138.885,146.982)
+VREFDDR4: C266.2 C267.2 C282.2 R221.2 R223.2 U14.M1 U15.M1 | length 35.9
  1_Top w0.25: v1(120.8,54.85) 120.8,54.8 U15.M1@120.8,55.4 ; U14.M1@120.8,68.1 120.8,67.65 v1(120.9,67.55)
  16_Bottom w0.25: C282.2@120.8,54.41 v1(120.8,54.85)
  16_Bottom w0.3: R221.2@116.9,53.25 117.015,53.365 C267.2@117.65,53.365 119.375,53.365 ; R223.2@120.38,53.62 120.8,54.04 C282.2@120.8,54.41 ; R223.2@120.38,53.625 120.1,53.625 119.84,53.365 119.375,53.365 ; v1(120.9,67.55) C266.2@120.9,67.06 121.46,67.06 123.345,65.175 125.825,65.175 127.7,63.3 127.7,53.75 124.99,51.04 120.26,51.04 119.375,51.925 119.375,53.365